# Altium PCB PCB1.PcbDoc
Units mm, origin at the board's own origin, x right, y up, seen from the top; angles counter-clockwise.
Board outline 104 x 72 mm, 4 copper layers (Highspeed layer, GND, VDD, Signal), stack 1.466 mm thick; 91 components, 74 nets, 419 pads, 576 vias.
Unrouted connection lines stored in the file: 77.
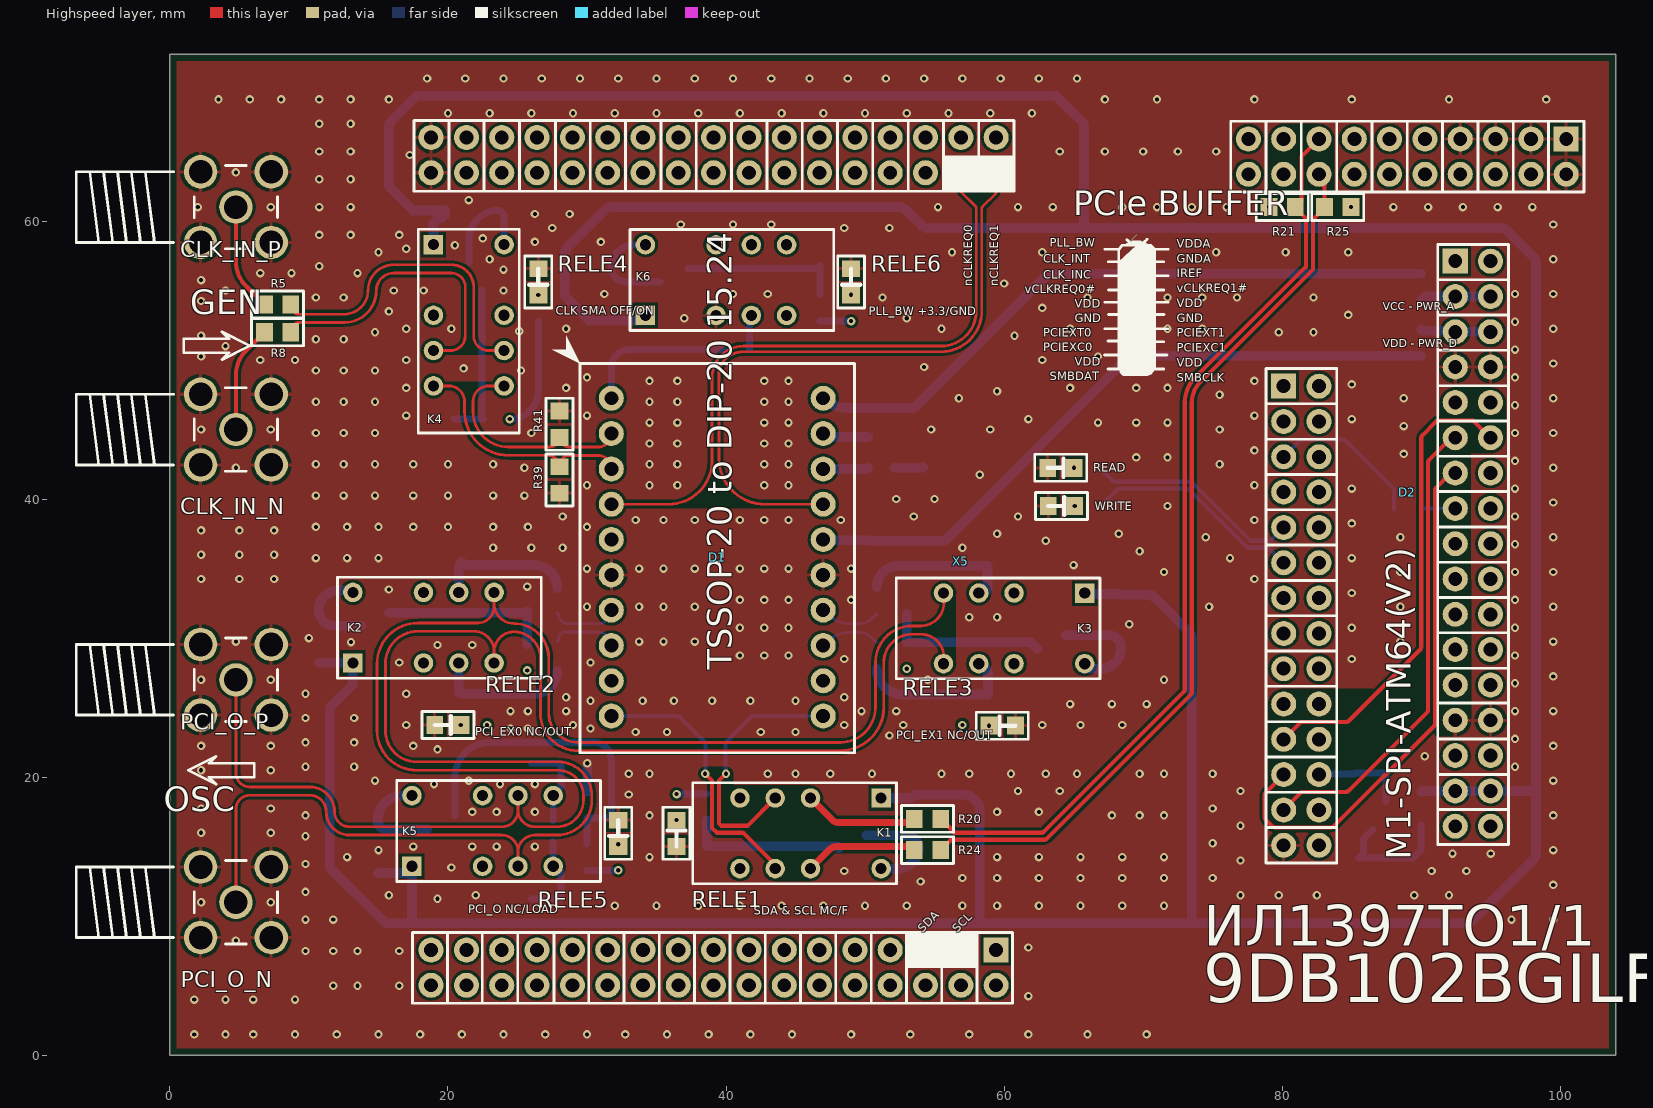
[diagram p0: Highspeed layer view]
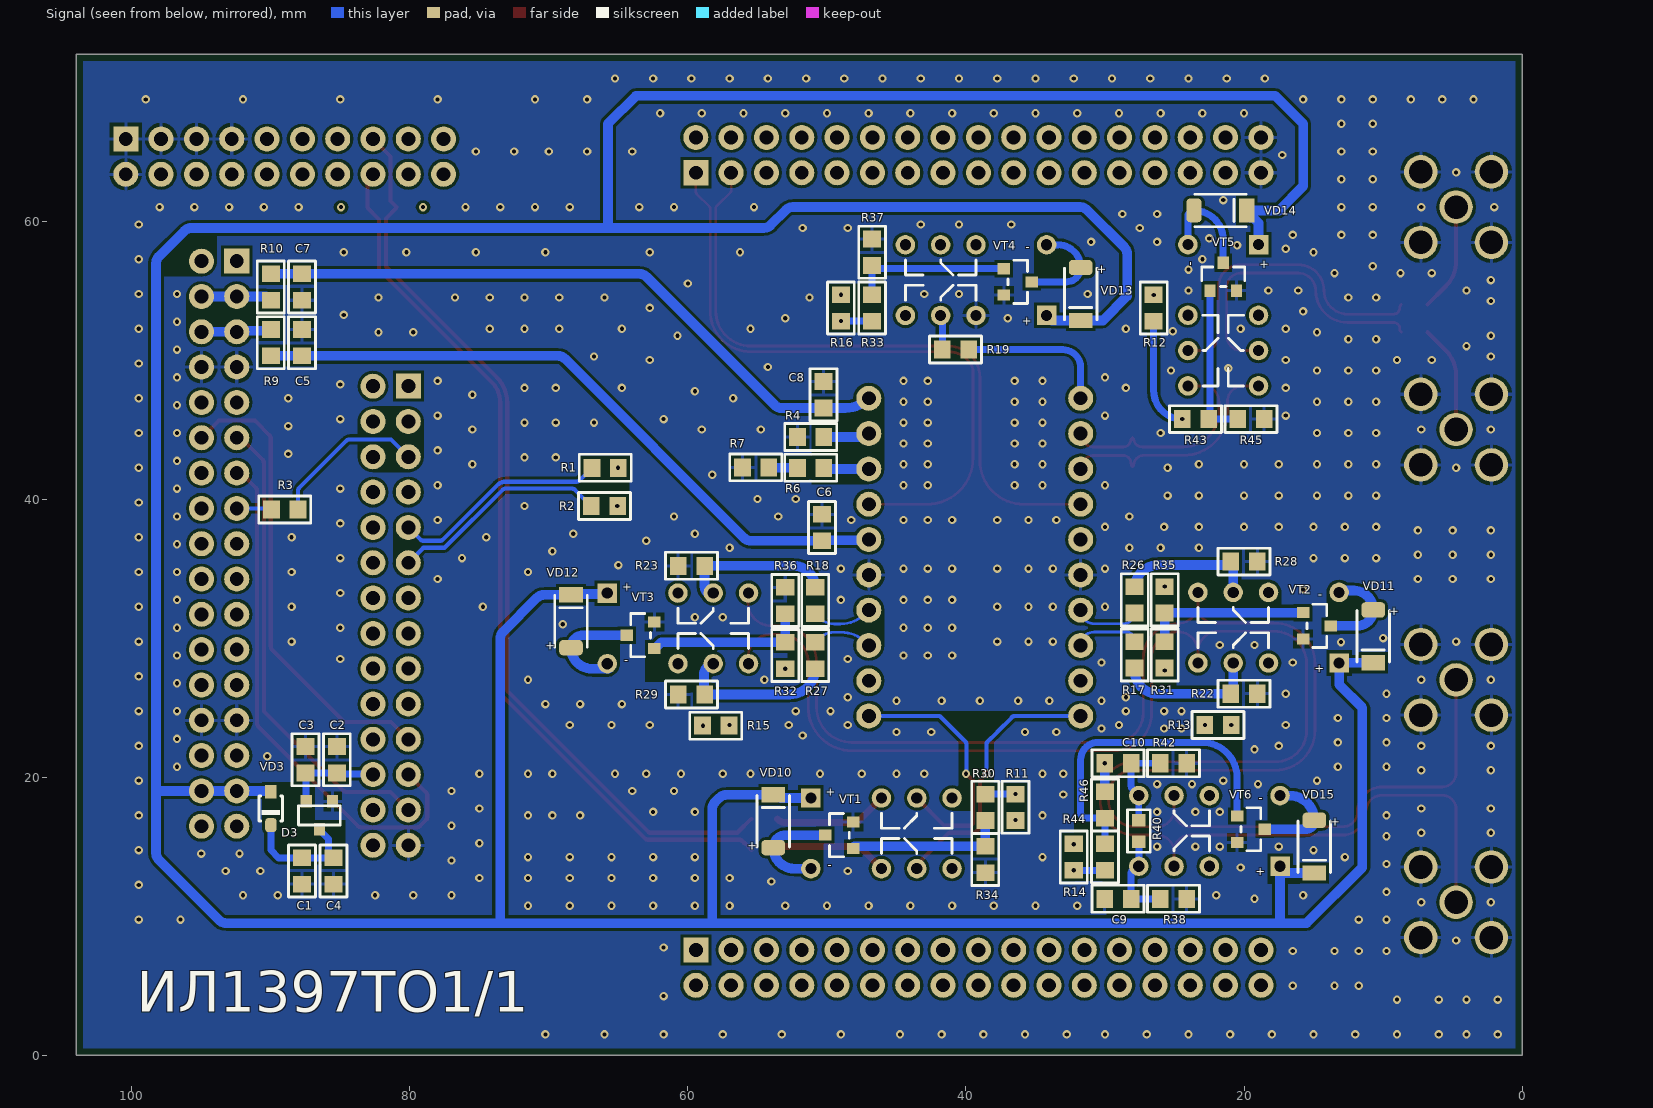
[diagram p1: Signal view, seen from below]
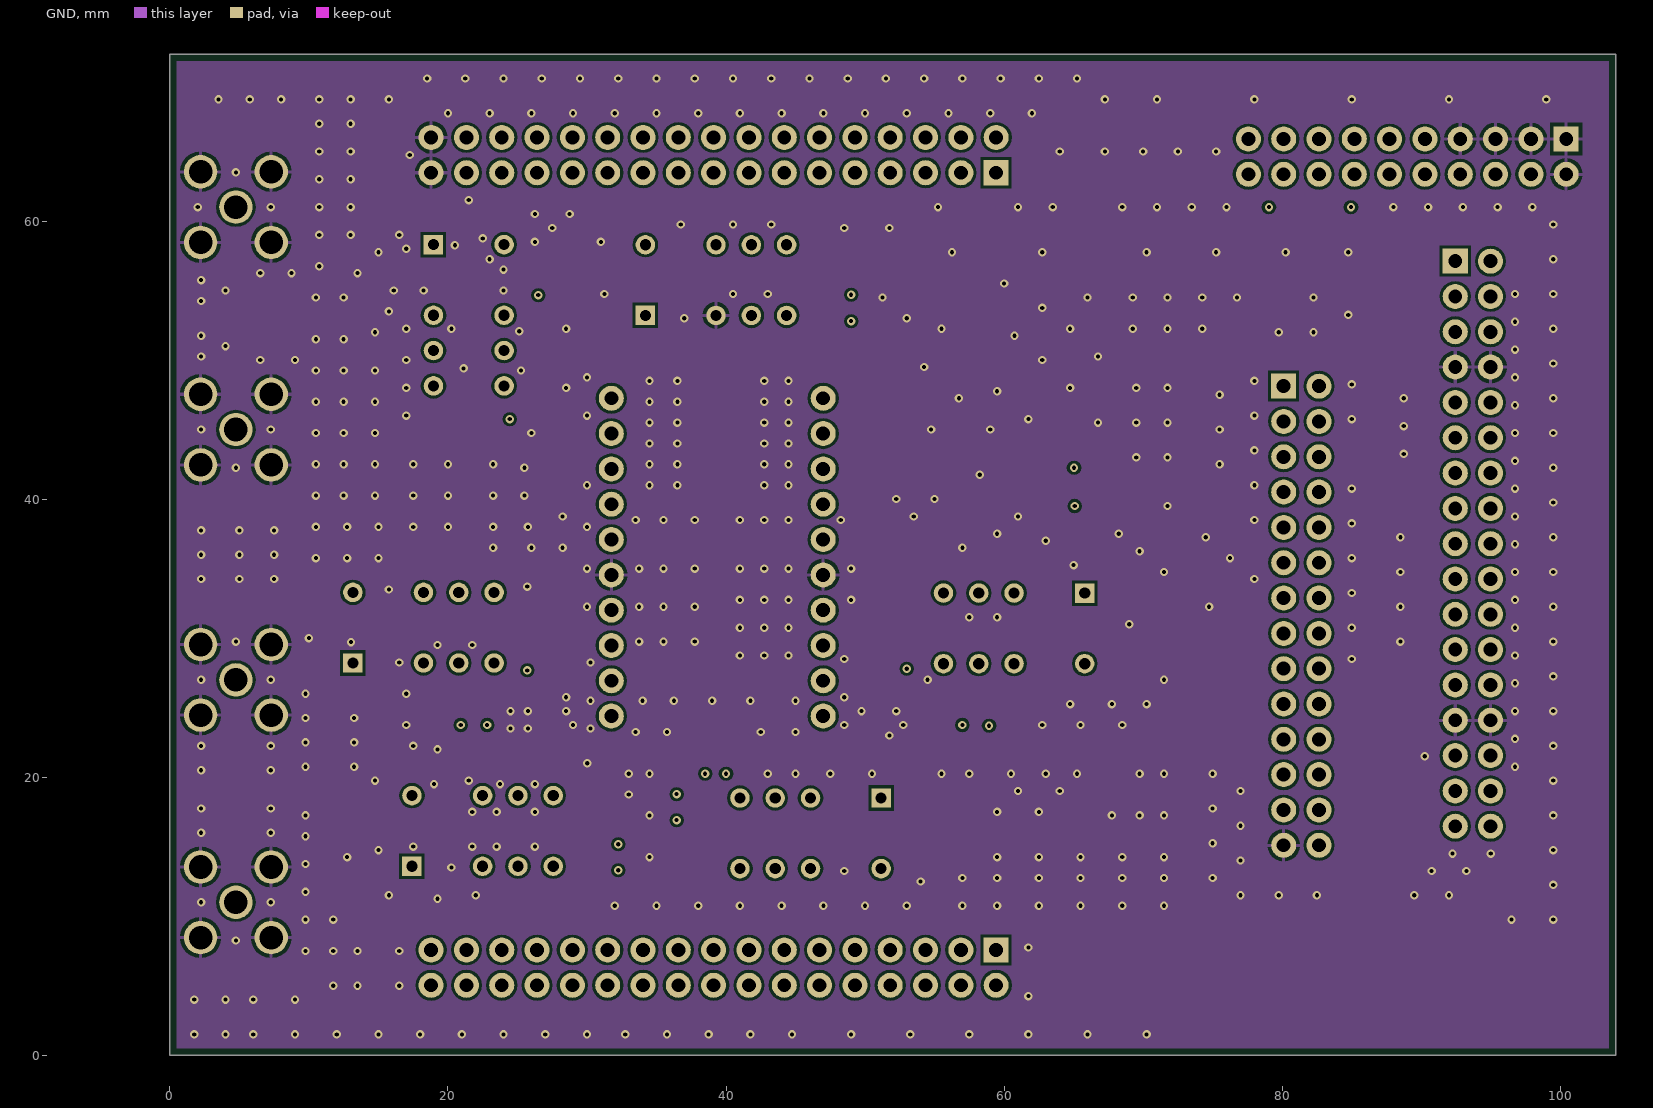
[diagram p2: GND]
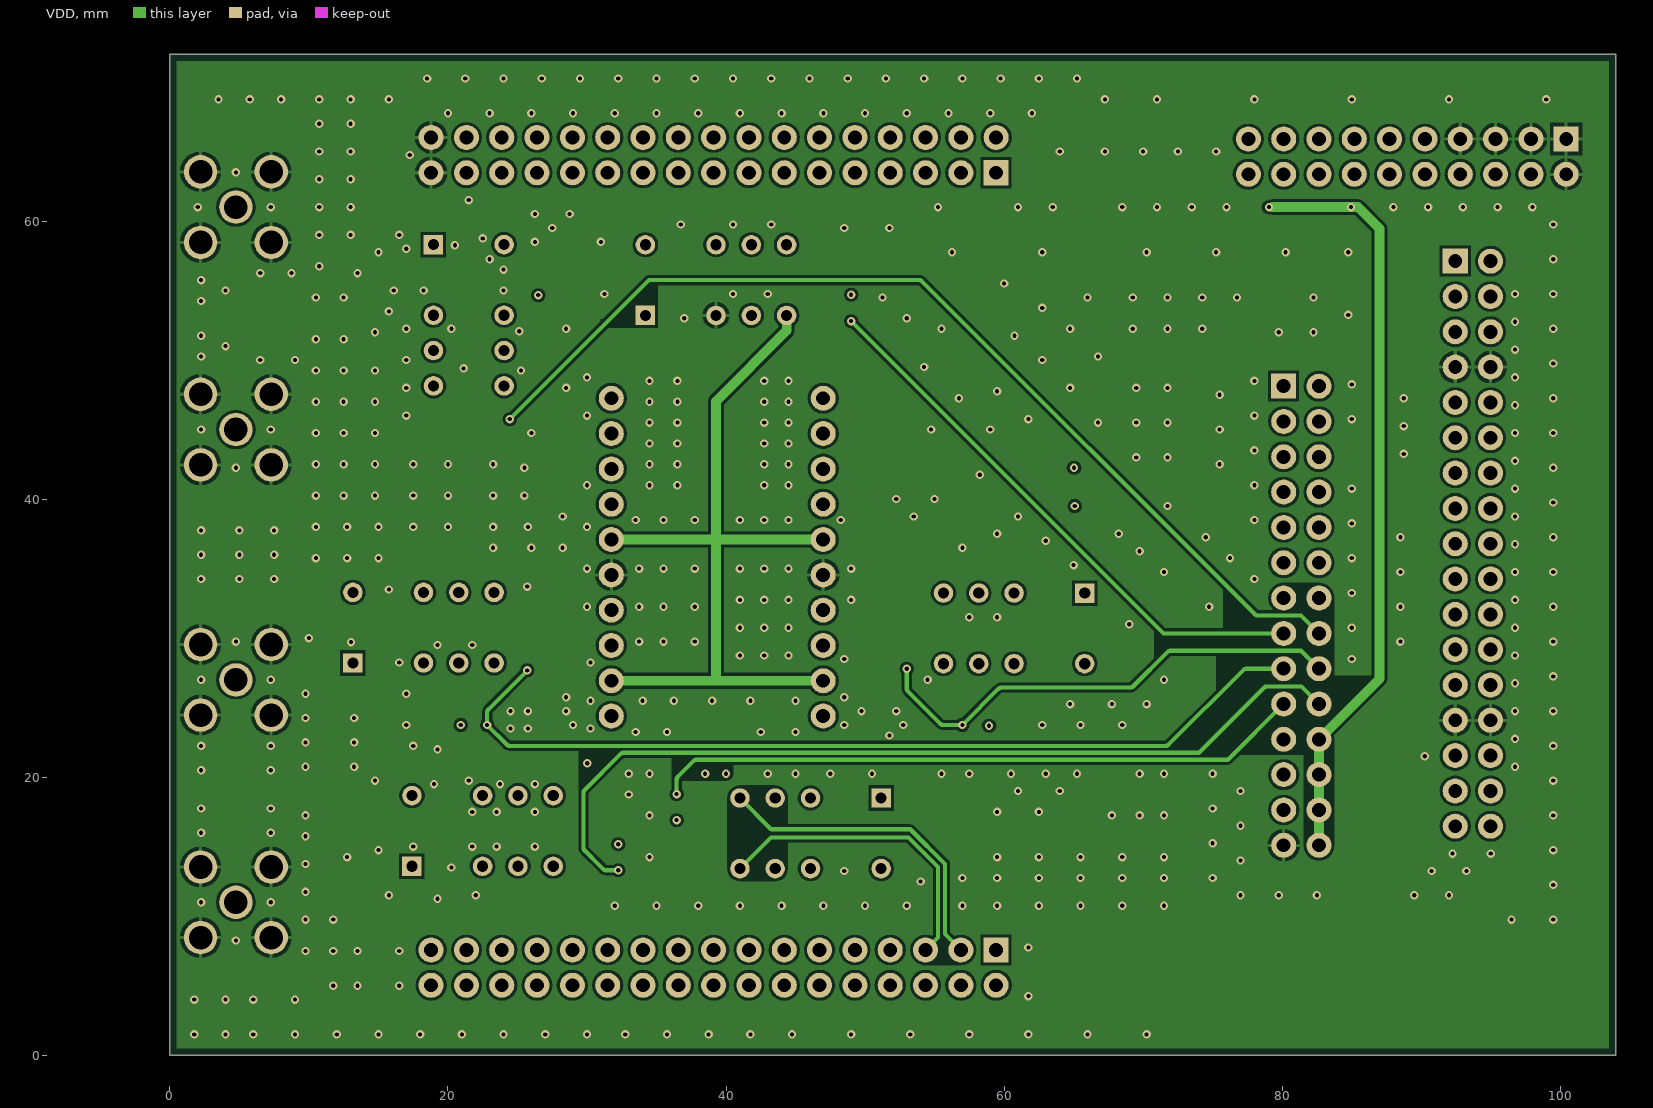
[diagram p3: VDD]

## Layer stack, top to bottom
Top Solder: solder mask 0.025, Solder Resist, Dk 4
Highspeed layer: signal copper 0.018
Dielectric 2: prepreg 0.115, FR4 PR, Dk 4.2
GND: signal copper 0.018
Dielectric 1: core 1.164, FR4 Tg150, Dk 4.6
VDD: signal copper 0.018
Dielectric 3: prepreg 0.115, FR4 PR, Dk 4.2
Signal: signal copper 0.018
Bottom Solder: solder mask 0.025, Solder Resist, Dk 4

## Board outline
0,0 104,0 104,72 0,72

## Design rules (kind name [scope] priority, off if disabled: settings)
Clearance [All] p1: gap=0.2 ignorepadtopadclearanceinfootprint=FALSE except(0: Arc-Hole Track-Hole SMDPad-Hole THPad-Hole Via-Hole Fill-Hole Poly-Hole Region-Hole Text-Hole)
ComponentClearance [All] p1: gap=0 collisioncheckmode=3 verticalgap=0 showdistances=FALSE
DiffPairsRouting [All] p1: maxlimit=0.4 minlimit=0.4 mostfreqgap=0.4 toplayer_minwidth=0.2 toplayer_maxwidth=0.2 toplayer_prefwidth=0.2 midlayer1_minwidth=0.2 midlayer1_maxwidth=0.2 midlayer1_prefwidth=0.2 midlayer2_minwidth=0.2 midlayer2_maxwidth=0.2 midlayer2_prefwidth=0.2 bottomlayer_minwidth=0.2 bottomlayer_maxwidth=0.2 bottomlayer_prefwidth=0.2 maxuncoupledlength=12.7
PolygonConnect [InNet('GND')] p1: thpad.connectstyle=Relief thpad.reliefconductorwidth=0.254 thpad.reliefentries=4 thpad.polygonreliefangle="90 Angle" thpad.airgapwidth=0.254 smdpad.connectstyle=Relief smdpad.reliefconductorwidth=0.254 smdpad.reliefentries=4 smdpad.polygonreliefangle="90 Angle" smdpad.airgapwidth=0.254 via.connectstyle=Direct via.reliefconductorwidth=0.254 via.reliefentries=4 via.polygonreliefangle="90 Angle" via.airgapwidth=0.254
RoutingVias [All] p1: holewidth=0.3 width=0.6 viastyle="Through Hole" minholewidth=0.3 minwidth=0.6 maxholewidth=0.6 maxwidth=1.2
SilkToSilkClearance [All] p1: silktosilkclearance=0
SilkToSolderMaskClearance [IsPad] p1: minsilkscreentomaskgap=0 clearancetoexposedcopper=TRUE
SolderMaskExpansion [All] p1: expansion=0.102 istentingtop=FALSE
Width [All] p1: maxlimit=0.7 minlimit=0.2 preferedwidth=0.3
26 further rules are at their usual default settings.

## Classes and differential pairs
differential pair PCI_O: +PCI_O_P -PCI_O_N
differential pair PCI_EX1: +PCI_EX1_P -PCI_EX1_N
differential pair PCI_EX0: +PCI_EX0_P -PCI_EX0_N
differential pair CLK_IN: +CLK_IN_P -CLK_IN_N
differential pair CLK_IN1: +CLK_IN1_P -CLK_IN1_N

## Components (designator, comment, footprint, x,y, rotation, side; value= is the part's Value field where it differs from the comment)
C1 "10uF" 0805 87.75,13.25 r270 bottom
C2 "0.1uF" 0805 85.25,21.25 r90 bottom
C3 "10uF" 0805 87.5,21.25 r90 bottom
C4 "0.1uF" 0805 85.5,13.25 r270 bottom
C5 "10uF" 0805 87.75,51.25 r90 bottom
C6 "0.1uF" 0805 50.35,37.948 r90 bottom
C7 "10uF" 0805 87.75,55.25 r270 bottom
C8 "0.1uF" 0805 50.25,47.5 r90 bottom
C9 "2pF" 0805 29.074,11.25 r0 bottom
C10 "2pF" 0805 29.074,21 r0 bottom
CLK_IN_N "KLS1-SMA002-B" KLS1-SMA002-B 4.75,45 r90 top (schematic designator X2)
CLK_IN_P "KLS1-SMA002-B" KLS1-SMA002-B 4.75,61 r90 top (schematic designator X1)
D1 "9DB102BGILF" "TSSOP-20 to DIP-20" 31.75,47.25 r0 top
D2 "M1-SPI-ATM64(V2)" M1-SPI-ATM64(V2) 89,40.5 r270 top
D3 "MCP1700T-3302E/TT" SOT-23#1 86.5,17.25 r0 bottom
K1 "V23079A1001B301 TE" V23079A1001B301 44.86,15.96 r180 top
K2 "V23079A1001B301 TE" V23079A1001B301 19.46,30.75 r0 top
K3 "V23079A1001B301 TE" V23079A1001B301 59.5,30.7 r180 top
K4 "V23079A1001B301 TE" V23079A1001B301 21.5,52 r270 top locked
K5 "V23079A1001B301 TE" V23079A1001B301 23.714,16.13 r0 top
K6 "V23079A1001B301 TE" V23079A1001B301 40.5,55.75 r0 top
PCI_O_N "KLS1-SMA002-B" KLS1-SMA002-B 4.75,11 r90 top (schematic designator X4)
PCI_O_P "KLS1-SMA002-B" KLS1-SMA002-B 4.75,27 r90 top (schematic designator X3)
R1 "1k" 0805 65.95,42.25 r180 bottom
R2 "1k" 0805 66,39.5 r180 bottom
R3 "100" 0805 89,39.25 r0 bottom
R4 "0" 0805 51.172,44.464 r180 bottom
R5 "33" 0805 7.75,54 r180 top
R6 "470" 0805 51.172,42.25 r0 bottom
R7 "5" 0805 55.128,42.28 r0 bottom
R8 "33" 0805 7.75,52 r180 top
R9 "0" 0805 90,51.25 r270 bottom
R10 "0" 0805 90,55.25 r90 bottom
R11 "1k" 0805 36.447,17.83 r270 bottom
R12 "1k" 0805 26.5,53.75 r90 bottom
R13 "1k" 0805 21.87,23.75 r180 bottom
R14 "1k" 0805 32.25,14.25 r90 bottom
R15 "1k" 0805 58,23.7 r0 bottom
R16 "1k" 0805 49,53.75 r90 bottom
R17 "33" 0805 27.866,28.795 r270 bottom
R18 "33" 0805 50.843,32.701 r90 bottom
R19 "100" 0805 40.75,50.75 r0 bottom
R20 "100" 0805 54.5,17 r0 top
R21 "10k" 0805 80,61 r180 top
R22 "49.9" 0805 20,26 r0 bottom
R23 "49.9" 0805 59.75,35.2 r180 bottom
R24 "100" 0805 54.5,14.75 r0 top
R25 "10k" 0805 84,61 r0 top
R26 "33" 0805 27.866,32.751 r90 bottom
R27 "33" 0805 50.843,28.745 r270 bottom
R28 "49.9" 0805 20,35.5 r0 bottom
R29 "49.9" 0805 59.75,25.95 r180 bottom
R30 "1k" 0805 38.61,17.83 r270 bottom
R31 "1k" 0805 25.71,28.795 r90 bottom
R32 "1k" 0805 53,28.745 r90 bottom
R33 "1k" 0805 46.75,53.75 r90 bottom
R34 "20k" 0805 38.61,14.08 r270 bottom
R35 "20k" 0805 25.71,32.751 r90 bottom
R36 "20k" 0805 53,32.7 r90 bottom
R37 "20k" 0805 46.75,57.75 r90 bottom
R38 "150" 0805 25.074,11.25 r180 bottom
R39 "10k" 0805 28.03,41.38 r270 top
R40 "100" 0603 27.571,16.13 r270 bottom
R41 "10k" 0805 28.03,45.38 r90 top
R42 "150" 0805 25.074,21 r0 bottom
R43 "1k" 0805 23.5,45.75 r180 bottom
R44 "1k" 0805 30.009,14.25 r90 bottom
R45 "20k" 0805 19.5,45.75 r180 bottom
R46 "20k" 0805 30,18 r90 bottom
READ "LED(0805)" 0805(LED) 64.08,42.25 r180 top (schematic designator VD1)
RELE1 "LED(0805)" 0805(LED) 36.447,15.96 r270 top (schematic designator VD4)
RELE2 "LED(0805)" 0805(LED) 20,23.75 r180 top (schematic designator VD6)
RELE3 "LED(0805)" 0805(LED) 59.87,23.7 r0 top (schematic designator VD8)
RELE4 "LED(0805)" 0805(LED) 26.5,55.62 r90 top (schematic designator VD5)
RELE5 "LED(0805)" 0805(LED) 32.25,15.96 r90 top (schematic designator VD7)
RELE6 "LED(0805)" 0805(LED) 49,55.62 r90 top (schematic designator VD9)
VD3 "BAT20JFILM (SOD323)" SOD323 90,17.75 r90 bottom
VD10 "LL4148 NXP" SOD80C 53.86,16.83 r90 bottom
VD11 "LL4148 NXP" SOD80C 10.71,30.13 r270 bottom
VD12 "LL4148 NXP" SOD80C 68.41,31.21 r90 bottom
VD13 "LL4148 NXP" SOD80C 31.75,54.75 r270 bottom
VD14 "LL4148 NXP" SOD80C 21.7,60.76 r180 bottom
VD15 "LL4148 NXP" SOD80C 14.944,15 r270 bottom
VT1 "MMBT5551L" SOT-23#2 49.11,15.83 r90 bottom
VT2 "MMBT5551L" SOT-23#2 14.76,30.88 r270 bottom
VT3 "MMBT5551L" SOT-23#2 63.41,30.21 r90 bottom
VT4 "MMBT5551L" SOT-23#2 36.27,55.62 r270 bottom
VT5 "MMBT5551L" SOT-23#2 21.5,56 r180 bottom
VT6 "MMBT5551L" SOT-23#2 19.5,16.25 r270 bottom
WRITE "LED(0805)" 0805(LED) 64.13,39.5 r180 top (schematic designator VD2)
X5 "FORMULA" FORMULA 47.25,34.25 r0 top locked

## Footprints (in the part's own frame and the unit in brackets; to place one, negate y for a bottom-side part, rotate by r counter-clockwise, add the part's x,y. Pads: shape width x height; smd on the part's side, far side on the other; paste and mask are expansions set on the pad)
0603 [mm]
  rect 0.9x1 smd: 1(-0.76,0) 2(0.76,0)
  silkscreen extent -1.53,-0.82 1.53,0.82, body extent -0.8,-0.4 0.8,0.4, height 0.45
0805 [mm]
  rect 1.2x1.3 smd: 1(-0.95,0) 2(0.95,0)
  silkscreen extent -1.87,-0.97 1.87,0.97, body extent -1.05,-0.63 0.95,0.63, height 0.55
0805(LED) [mm]
  rect 1.2x1.3 smd: 1(-0.95,0) 2(0.95,0)
  silkscreen extent -1.87,-0.97 1.87,0.97, body extent -1.03,-0.41 1.03,0.5, height 0.85
FORMULA [mm]
  rect 1.8x1.8 hole 1: 1(12.18,29.22) VDDF(12.18,-26.68) VEEF(45.2,22.86)
  round 1.8 hole 1: 2(9.64,29.22) 3(7.1,29.22) 4(4.56,29.22) 5(2.02,29.22) 6(-0.52,29.22) 7(-3.06,29.22) 8(-5.6,29.22) 9(-8.14,29.22) 10(-10.68,29.22) 11(-13.22,29.22) 12(-15.76,29.22) 13(-18.3,29.22) 14(-20.84,29.22) 15(-23.38,29.22) 16(-25.92,29.22) 17(12.18,31.76) 18(9.64,31.76) 19(7.1,31.76) 20(4.56,31.76) 21(2.02,31.76) 22(-0.52,31.76) 23(-3.06,31.76) 24(-5.6,31.76) 25(-8.14,31.76) 26(-10.68,31.76) 27(-13.22,31.76) 28(-15.76,31.76) 29(-18.3,31.76) 30(-20.84,31.76) 31(-23.38,31.76) 32(-25.92,31.76) 33(-28.46,-29.22) 34(-25.92,-29.22) 35(-23.38,-29.22) 36(-20.84,-29.22) 37(-18.3,-29.22) 38(-15.76,-29.22) 39(-13.22,-29.22) 40(-10.68,-29.22) 41(-8.14,-29.22) 42(-5.6,-29.22) 43(-3.06,-29.22) 44(-0.52,-29.22) 45(2.02,-29.22) 46(4.56,-29.22) 47(7.1,-29.22) 48(9.64,-29.22) 49(-28.46,-26.68) 50(-25.92,-26.68) 51(-23.38,-26.68) 52(-20.84,-26.68) 53(-18.3,-26.68) 54(-15.76,-26.68) 55(-13.22,-26.68) 56(-10.68,-26.68) 57(-8.14,-26.68) 58(-5.6,-26.68) 59(-3.06,-26.68) 60(-0.52,-26.68) 61(2.02,-26.68) 62(4.56,-26.68) 63(7.1,-26.68) 64(9.64,-26.68) +5V(45.2,-15.24) +5V(47.74,-15.24) +5V_VCCF(45.2,20.32) +5V_VCCS(47.74,20.32) +5V_VDDF(45.2,17.78) +5V_VDDS(47.74,17.78) +12V(45.2,-12.7) +12V(47.74,-12.7) -12V(45.2,-17.78) -12V(47.74,-17.78) GND(-28.46,29.22) GND(-28.46,31.76) GND(45.2,-10.16) GND(45.2,15.24) GND(47.74,-10.16) GND(47.74,15.24) IN-OUT1(47.74,10.16) IN-OUT2(47.74,7.62) IN-OUT3(47.74,5.08) IN-OUT4(47.74,2.54) IN-OUT5(47.74,0) IN-OUT6(47.74,-2.54) IN-OUT7(47.74,-5.08) IN-OUT8(47.74,-7.62) NC(45.2,12.7) NC(47.74,12.7) OUT1(45.2,10.16) OUT2(45.2,7.62) OUT3(45.2,5.08) OUT4(45.2,2.54) OUT5(45.2,0) OUT6(45.2,-2.54) OUT7(45.2,-5.08) OUT8(45.2,-7.62) VDDS(12.18,-29.22) VEES(47.74,22.86)
  silkscreen extent -29.8,-30.51 49.02,32.97, body extent -29.79,-30.4 48.98,32.92, height 3
KLS1-SMA002-B [mm]
  round 2.4 hole 1.7: 1(0,0) 2(-2.54,-2.54) 2(-2.54,2.54) 2(2.54,-2.54) 2(2.54,2.54)
  silkscreen extent -3,-3 3,11.49, body extent -3.5,-3.5 3.5,11.65, height 10
M1-SPI-ATM64(V2) [mm]
  rect 1.8x1.8 hole 1: 1X2(-25.4,11.43) 1X3(-7.62,-8.89)
  round 1.8 hole 1: 2X2(-22.86,11.43) 2X3(-7.62,-6.35) 3X2(-25.4,8.89) 3X3(-5.08,-8.89) 4X2(-22.86,8.89) 4X3(-5.08,-6.35) 5X2(-25.4,6.35) 5X3(-2.54,-8.89) 6X2(-22.86,6.35) 6X3(-2.54,-6.35) 7X2(-25.4,3.81) 7X3(0,-8.89) 8X2(-22.86,3.81) 8X3(0,-6.35) 9X2(-25.4,1.27) 9X3(2.54,-8.89) 10X2(-22.86,1.27) 10X3(2.54,-6.35) 11X2(-25.4,-1.27) 11X3(5.08,-8.89) 12X2(-22.86,-1.27) 12X3(5.08,-6.35) 13X2(-25.4,-3.81) 13X3(7.62,-8.89) 14X2(-22.86,-3.81) 14X3(7.62,-6.35) 15X2(-25.4,-6.35) 15X3(10.16,-8.89) 16X2(-22.86,-6.35) 16X3(10.16,-6.35) 17X2(-25.4,-8.89) 17X3(12.7,-8.89) 18X2(-22.86,-8.89) 18X3(12.7,-6.35) 19X2(-25.4,-11.43) 19X3(15.24,-8.89) 20X2(-22.86,-11.43) 20X3(15.24,-6.35) 21X3(17.78,-8.89) 22X3(17.78,-6.35) 23X3(20.32,-8.89) 24X3(20.32,-6.35) 25X3(22.86,-8.89) 26X3(22.86,-6.35) 27X3(25.4,-8.89) 28X3(25.4,-6.35)
  silkscreen extent -26.67,-12.7 26.67,12.7
SOD80C [mm]
  rrect50% 1.1x1.7 smd: 1(-1.9,0)
  rect 1.1x1.7 smd: 2(1.9,0)
  silkscreen extent -1.85,-1.17 1.85,1.17, body extent -1.9,-0.8 1.8,0.8, height 1.55
SOD323 [mm]
  rect 1x0.8 smd: 1(1.2,0)
  rrect50% 1x0.8 smd: 2(-1.2,0)
  silkscreen extent -0.9,-0.84 0.9,0.84, body extent -1.41,-0.67 1.19,0.67, height 1.1
SOT-23#1 [mm]
  rect 0.8x0.9 smd: 1(-0.95,-1) 2(0.95,-1) 3(0,1)
  silkscreen extent -1.5,-0.7 1.5,0.7, body extent -1.5,-1.15 1.5,1.15, height 1.09
SOT-23#2 [mm]
  rect 0.8x0.9 smd: 1(-0.95,-1) 1(-0.95,-1) 2(0.95,-1) 2(0.95,-1) 3(0,1) 3(0,1)
  silkscreen extent -1.55,-0.72 1.55,0.7, body extent -1.5,-1.25 1.5,1.25, height 1.05
"TSSOP-20 to DIP-20" [mm]
  round 1.8 hole 1: 1(0,0) 2(0,-2.54) 3(0,-5.08) 4(0,-7.62) 5(0,-10.16) 6(0,-12.7) 7(0,-15.24) 8(0,-17.78) 9(0,-20.32) 10(0,-22.86) 11(15.24,-22.86) 12(15.24,-20.32) 13(15.24,-17.78) 14(15.24,-15.24) 15(15.24,-12.7) 16(15.24,-10.16) 17(15.24,-7.62) 18(15.24,-5.08) 19(15.24,-2.54) 20(15.24,0)
  silkscreen extent -2.25,-25.5 17.5,2.5, body extent -1,-24.45 16.5,1.5, height 8.5
V23079A1001B301 [mm]
  rect 1.4x1.4 hole 0.8: 1(-6.3,-2.54)
  round 1.4 hole 0.8: 3(-1.22,-2.54) 4(1.32,-2.54) 5(3.86,-2.54) 8(3.86,2.54) 9(1.32,2.54) 10(-1.22,2.54) 12(-6.3,2.54)
  silkscreen extent -7.4,-3.63 7.25,3.63, body extent -7.25,-3.6 7.25,3.6, height 9.4

## Part data
C1 C2 C3 C4 C5 C6 C7 C8 C9 C10: library part C0805, ComponentHeigt=1.3, Firme=AVX, KIND=Конденсатор, Leadform=SMD, Packaging=0805
R1 R2 R3 R4 R5 R8 R9 R10 R11 R12 R13 R14 R15 R16 R17 R18 R19 R20 R21 R22 R23 R24 R25 R26 R27 R28 R29 R30 R31 R32 R33 R34 R35 R36 R37 R38 R39 R41 R42 R43 R44 R45 R46: library part "R0805 Yageo", ComponentHeigt=0.6, Firme=Yageo, KIND=Резистор, Leadform=SMD, Packaging=0805
R6 R7: library part "R0805 Yageo", "1%", ComponentHeigt=0.6, Firme=Yageo, KIND=Резистор, Leadform=SMD, Packaging=0805
R40: library part "R0603 Yageo", ComponentHeigt=0.5, Firme=Yageo, KIND=Резистор, Leadform=SMD, Packaging=0402
CLK_IN_N CLK_IN_P D2 PCI_O_N PCI_O_P: ComponentHeigt=5.5, Name=Вилка, Specification="Вилка PLD2-2 *", Typ=PLD2-2
D3: ComponentHeigt=1.8, Firme=Linear, KIND=Микросхема, Leadform=формована, Packaging=SOT-223
READ RELE1 RELE2 RELE3 RELE4 RELE5 RELE6 VD3 WRITE: ComponentHeigt=0.75, Firme=Kingbright, KIND="Светодиод L-1154GD Kingbright", Leadform="в отверстия", NN=24003000
VD10 VD11 VD12 VD13 VD14 VD15: Component Link=http://www.nxp.com, ComponentHeigt=1.6, Firme=NXP, KIND="Диод LL4148 NXP", Leadform=SMD, NN=24009301, Packaging=SOD-80C
VT1 VT2 VT3 VT4 VT5 VT6: ComponentHeigt=1.1, Firme=ONS, KIND="Транзистор MMBT5551L*G ONS", Leadform=SMD, NN=24007468, Packaging=SOT-23

## Via types
v1: diameter 0.6, hole 0.3, Highspeed layer to Signal, tented both sides, 576 vias

## Nets (pads, with @x,y where several pads share a name; then routed paths per layer and width w, separated by ;. In a path a pad name is that pad's centre, name@x,y a point inside that pad or via, vN(x,y) a via of type N, cw(c..) or ccw(c..) an arc to the next point about the centre after c; other vN are vias at no path point)
+3.3_PWR_A: C7.1 C8.1 D1.20 R10.2 | length 47.1
  Signal w0.7: D1.20 ccw(c48.68,48.94) 48.68,46.55 C8.1 53.26,46.55 ccw(c53.26,47.25) 53.754,46.754 62.996,55.996 cw(c63.49,55.5) 63.488,56.2 63.49,56.2 C7.1 R10.2
+3.3_PWR_D: C5.1 C6.1 D1.5 D1.9 D1.12 D1.16 K6.5 R9.2 | length 107.8
  VDD w0.7: D1.9@31.385,26.997 31.452,26.93 D1.9 39.37,26.93 ; D1.5 39.28,37.09 ; K6.5 44.36,52.11 39.28,47.03 39.28,37.09 ; D1.12 39.37,26.93 ; D1.16 39.28,37.09 ; 39.28,37.09 39.28,27.02 39.37,26.93
  Signal w0.7: D1.16 47.036,37.044 50.304,37.044 C6.1 55.458,36.998 ccw(c55.458,37.698) 55.952,37.202 68.846,50.096 cw(c69.34,49.6) 69.338,50.3 69.34,50.3 C5.1 R9.2
+3.3V_MC: C2.1 C3.1 D2.22X3 D2.24X3 D2.26X3 D2.28X3 D3.2 R21.2 R25.2 | length 61.5
  VDD w0.7: v1@79.3,61 85.2,61 85.455,61 87,59.455 87,27.07 D2.22X3 D2.24X3 D2.26X3 D2.28X3
  Signal w0.5: D2.24X3 82.71,20.24 85.19,20.24 C2.1 C3.1 87.475,20.275 87.475,18.275 D3.2
  other v1: 79.05,61 84.95,61
+3.3V_VCC: R10.1 X5.+5V_VCCF X5.+5V_VCCS | length 5.1
  Signal w0.7: R10.1 90.05,54.3 90.32,54.57 X5.+5V_VCCF X5.+5V_VCCS
+3.3V_VDD: R9.1 X5.+5V_VDDF X5.+5V_VDDS | length 5.1
  Signal w0.7: R9.1 90.085,52.115 92.365,52.115 X5.+5V_VDDF X5.+5V_VDDS
+5V_CONST: K1.1 K2.1 K3.1 K4.1 K5.1 K6.1 VD3.1 VD10.2 VD11.2 VD12.2 VD13.2 VD14.2 VD15.2 X5.+5V | length 365.9
  Signal w0.7: VD11.2 10.72,28.22 13.15,28.22 K2.1 13.16,26.66 11.5,25 11.5,13.5 15.5,9.5 17.414,9.5 ; VD15.2 16.924,13.1 ccw(c16.924,13.59) K5.1 17.414,9.5 ; K4.1 18.96,59.85 19.37,60.26 19.6,60.26 19.8,60.46 VD14.2 17.49,60.76 15.75,62.5 15.75,67 17.75,69 63.75,69 65.75,67 65.75,59.5 ; K6.1 cw(c33.84,53.21) 33.84,52.85 30.15,52.85 28.408,54.592 28.408,57.62 cw(c29.108,57.618) 28.612,58.112 31.296,60.796 cw(c31.79,60.3) 31.788,61 31.79,61 52.46,61 cw(c52.46,60.3) 52.953,60.797 54.046,59.704 ccw(c54.54,60.2) 54.538,59.5 65.75,59.5 ; K1.1 53.33,18.5 53.56,18.73 57.23,18.73 cw(c57.23,18.03) 57.724,18.526 58.046,18.204 cw(c57.55,17.71) 58.25,17.71 58.25,9.5 ; K3.1 65.865,33.175 68.345,33.175 VD12.2 70.35,33.11 cw(c70.35,32.41) 70.843,32.907 73.296,30.454 cw(c72.8,29.96) 73.5,29.962 73.5,29.96 73.5,9.5 ; VD3.1 90,18.96 90.05,19.01 92.45,19.01 94.99,19.01 97.99,19.01 98.25,18.75 ; 17.414,9.5 58.25,9.5 ; 58.25,9.5 73.5,9.5 ; 65.75,59.5 95.71,59.5 cw(c95.71,58.8) 96.206,59.294 98.045,57.455 cw(c97.55,56.96) 98.25,56.962 98.25,56.96 98.25,18.75 ; 73.5,9.5 93.21,9.5 ccw(c93.21,10.2) 93.704,9.704 98.047,14.047 ccw(c97.55,14.54) 98.25,14.54 98.25,18.75
CLK_IN1_N: K4.4 R8.1 | length 22
  Highspeed layer w0.2: R8.1 ccw(c8.459,52.241) 8.8,52.241 cw(c9.259,52.241) 9.259,52.7 12.55,52.7 ccw(c12.55,55) 14.85,55 cw(c16.1,55) 16.1,56.25 20.25,56.25 cw(c20.25,55.25) 21.25,55.25 21.25,51.75 cw(c20.18,51.75) 20.18,50.68 K4.4
CLK_IN1_P: K4.9 R5.1 | length 22.8
  Highspeed layer w0.2: R5.1 cw(c8.459,53.759) 8.8,53.759 ccw(c9.259,53.759) 9.259,53.3 12.55,53.3 ccw(c12.55,55) 14.25,55 cw(c16.1,55) 16.1,56.85 20.25,56.85 cw(c20.25,55.25) 21.85,55.25 21.85,51.75 ccw(c22.92,51.75) 22.92,50.68 K4.9
CLK_IN_N: D1.3 K4.5 R39.1 | length 17.4
  Highspeed layer w0.2: K4.5 20.06,48.14 cw(c20.06,47) 21.2,47 21.2,46.29 ccw(c24.34,46.29) 24.34,43.15 27.21,43.15 cw(c27.21,42.43) 27.93,42.43 R39.1 ccw(c27.789,42.571) 28.13,42.571 cw(c28.699,42.571) 28.699,43.14 30.78,43.14 cw(c30.78,42.17) D1.3
CLK_IN_P: D1.2 K4.8 R41.1 | length 16.3
  Highspeed layer w0.2: K4.8 22.94,48.14 ccw(c22.94,47) 21.8,47 21.8,46.29 ccw(c24.34,46.29) 24.34,43.75 27.35,43.75 ccw(c27.35,44.33) 27.93,44.33 R41.1 28.13,44.33 ccw(c28.72,44.33) 28.72,43.74 30.78,43.74 ccw(c30.78,44.71) D1.2
DI1_MC: D2.21X3 X5.IN-OUT1 | length 33.8
  Highspeed layer w0.3: D2.21X3 81.36,23.97 84.596,23.97 ccw(c84.596,24.27) 84.807,24.057 89.913,29.163 ccw(c89.7,29.374) 90,29.374 90,44.377 cw(c90.3,44.376) 90.087,44.587 91.073,45.573 cw(c91.284,45.36) 91.284,45.66 93.74,45.66 X5.IN-OUT1
DO1_MC: D2.25X3 X5.OUT1 | length 33.9
  Highspeed layer w0.3: D2.25X3 81.4,18.93 84.556,18.93 ccw(c84.556,19.23) 84.767,19.017 90.413,24.663 ccw(c90.2,24.874) 90.5,24.874 90.5,42.627 cw(c90.8,42.626) 90.587,42.837 92.073,44.323 cw(c92.284,44.11) 92.284,44.41 X5.OUT1
DO2_MC: D2.23X3 X5.OUT2 | length 38.1
  Highspeed layer w0.3: D2.23X3 78.838,18.908 ccw(c79.05,18.696) 78.75,18.696 78.75,17.124 ccw(c79.05,17.124) 78.837,16.913 79.273,16.477 ccw(c79.484,16.69) 79.483,16.39 83.516,16.39 ccw(c83.516,16.69) 83.727,16.477 90.913,23.663 ccw(c90.7,23.874) 91,23.874 91,40.627 cw(c91.3,40.626) 91.087,40.837 92.033,41.783 cw(c92.244,41.57) 92.244,41.87 X5.OUT2
GND: C1.2 C2.2 C3.2 C4.2 C5.2 C6.2 C7.2 C8.2 C9.2 C10.2 CLK_IN_N.2 CLK_IN_P.2 D1.6 D1.15 D2.1X2 D2.2X2 D2.3X2 D2.5X2 D2.7X2 D2.27X3 D3.1 K6.3 PCI_O_N.2 PCI_O_P.2 R4.1 R7.2 R22.1 R23.1 R28.1 R29.1 R34.2 R35.2 R36.2 R37.2 R38.2 R39.2 R41.2 R42.1 R45.2 R46.2 READ.2 RELE1.2 RELE2.2 RELE3.2 RELE4.2 RELE5.2 RELE6.2 VT1.2 VT2.2 VT3.2 VT4.2 VT5.2 VT6.2 WRITE.2 X5.GND | length 2.1
  Signal w0.7: R46.2 30.024,18.95 v1(30.024,21)
  other v1: 1.75,1.5 4,1.5 6,1.5 9,1.5 12,1.5 15,1.5 18,1.5 21,1.5 24,1.5 27,1.5 30,1.5 32.75,1.5 35.75,1.5 38.75,1.5 41.75,1.5 44.75,1.5 49,1.5 53.25,1.5 57.5,1.5 61.75,1.5 66,1.5 70.25,1.5 1.75,4 4,4 6,4 9,4 61.75,4.25 11.75,5 13.5,5 16.5,5 9.75,7.5 11.75,7.5 13.5,7.5 16.5,7.5 61.75,7.75 4.75,8.25 9.75,9.75 11.75,9.75 96.5,9.75 99.5,9.75 32,10.75 35,10.75 38,10.75 41,10.75 44,10.75 47,10.75 50,10.75 53,10.75 57,10.75 59.5,10.75 62.5,10.75 65.5,10.75 68.5,10.75 71.5,10.75 2.25,11 7.25,11 19.25,11.25 15.75,11.5 22,11.5 77,11.5 79.75,11.5 82.5,11.5 89.5,11.5 92,11.5 9.75,11.75 99.5,12.25 54,12.5 57,12.75 59.5,12.75 62.5,12.75 65.5,12.75 68.5,12.75 71.5,12.75 75,12.75 48.5,13.25 90.75,13.25 93.25,13.25 20.25,13.5 9.75,13.75 77,14 12.75,14.25 34.5,14.25 59.5,14.25 62.5,14.25 65.5,14.25 68.5,14.25 71.5,14.25 92.25,14.5 95,14.5 15,14.75 99.5,14.75 17.5,15 21.75,15 23.5,15 26.25,15 75,15.25 9.75,15.75 2.25,16 7.25,16 77,16.5 9.75,17.25 34.5,17.25 67.75,17.25 69.75,17.25 71.5,17.25 99.5,17.25 21.75,17.5 23.5,17.5 26.25,17.5 59.5,17.5 62.5,17.5 2.25,17.75 7.25,17.75 75,17.75 33,18.75 61,19 64,19 77,19 19,19.5 23.75,19.5 26.25,19.5 14.75,19.75 21.5,19.75 99.5,19.75 33,20.25 34.5,20.25 43,20.25 45,20.25 47.5,20.25 50.5,20.25 55.5,20.25 57.5,20.25 60.5,20.25 63,20.25 65.25,20.25 69.75,20.25 71.5,20.25 75,20.25 2.25,20.5 7.25,20.5 9.75,20.75 13.25,20.75 96.75,20.75 90.25,21.5 19.25,22 2.25,22.25 7.25,22.25 17.5,22.25 99.5,22.25 9.75,22.5 13.25,22.5 96.75,22.75 51.75,23 33.5,23.25 35.75,23.25 42.5,23.25 45,23.25 24.5,23.5 25.75,23.5 30.25,23.5 17,23.75 29,23.75 48.5,23.75 52.75,23.75 62.75,23.75 65.5,23.75 68.5,23.75 9.75,24.25 13.25,24.25 24.5,24.75 25.75,24.75 28.5,24.75 49.75,24.75 52.25,24.75 96.75,24.75 99.5,24.75 64.75,25.25 67.75,25.25 70.25,25.25 30.25,25.5 34,25.5 36.25,25.5 39,25.5 41.75,25.5 45,25.5 28.5,25.75 48.5,25.75 9.75,26 17,26 96.75,26.75 2.25,27 7.25,27 54.5,27 71.5,27 99.5,27.25 16.5,28.25 30.25,28.25 48.5,28.5 85,28.5 41,28.75 42.75,28.75 44.5,28.75 96.75,28.75 19.25,29.5 21.75,29.5 13.033,29.713 4.75,29.75 33.75,29.75 35.5,29.75 37.75,29.75 88.5,29.75 99.5,29.75 10,30 41,30.75 42.75,30.75 44.5,30.75 85,30.75 96.75,30.75 69,31 57.5,31.5 59.5,31.5 30,32.25 33.75,32.25 35.5,32.25 37.75,32.25 74.75,32.25 88.5,32.25 99.5,32.25 41,32.75 42.75,32.75 44.5,32.75 49,32.75 96.75,32.75 85,33.25 15.75,33.5 25.71,33.701 2.25,34.25 5,34.25 7.5,34.25 78,34.25 71.5,34.75 88.5,34.75 96.75,34.75 99.5,34.75 30,35 33.75,35 35.5,35 37.75,35 41,35 42.75,35 44.5,35 49,35 65,35.25 10.5,35.75 12.75,35.75 15,35.75 76.25,35.75 85,35.75 2.25,36 5,36 7.5,36 69.75,36.25 23.25,36.5 26,36.5 28.25,36.5 57,36.5 96.75,36.75 63,37 74.5,37.25 88.5,37.25 99.5,37.25 59.5,37.5 68.25,37.5 2.25,37.75 5,37.75 7.5,37.75 10.5,38 12.75,38 15,38 17.5,38 20,38 23.25,38 25.75,38 30,38 85,38.25 33.5,38.5 35.5,38.5 37.75,38.5 41,38.5 42.75,38.5 44.5,38.5 48.25,38.5 78,38.5 28.25,38.75 53.5,38.75 61,38.75 96.75,38.75 71.75,39.5 99.5,39.75 52.25,40 55,40 10.5,40.25 12.5,40.25 14.75,40.25 17.5,40.25 20,40.25 23.25,40.25 25.5,40.25 85,40.75 96.75,40.75 30,41 34.5,41 36.5,41 42.75,41 44.5,41 78,41 58.25,41.75 4.75,42.25 25.5,42.25 99.5,42.25 10.5,42.5 12.5,42.5 14.75,42.5 17.5,42.5 20,42.5 23.25,42.5 34.5,42.5 36.5,42.5 42.75,42.5 44.5,42.5 75.5,42.5 96.75,42.75 69.5,43 71.75,43 88.75,43.25 78,43.5 34.5,44 36.5,44 42.75,44 44.5,44 10.5,44.75 12.5,44.75 14.75,44.75 26,44.75 96.75,44.75 99.5,44.75 2.25,45 7.25,45 54.75,45 59,45 75.5,45 88.75,45.25 34.5,45.5 36.5,45.5 42.75,45.5 44.5,45.5 66.75,45.5 69.5,45.5 71.75,45.5 61.75,45.75 85,45.75 17,46 30,46 78,46 96.75,46.75 10.5,47 12.5,47 14.75,47 34.5,47 36.5,47 42.75,47 44.5,47 56.75,47.25 88.75,47.25 99.5,47.25 75.5,47.5 59.5,47.75 17,48 28.5,48 64.75,48 69.5,48 71.75,48 85,48.25 34.5,48.5 36.5,48.5 42.75,48.5 44.5,48.5 78,48.5 30,48.75 96.75,48.75 10.5,49.25 12.5,49.25 14.75,49.25 25.25,49.25 21.13,49.4 54.25,49.5 99.5,49.75 6.5,50 9,50 17,50 62.75,50 2.25,50.25 66.75,50.25 96.75,50.75 4,51 10.5,51.5 12.5,51.5 2.25,51.75 60.75,51.75 14.75,52 79.75,52 82.25,52 25.13,52.075 17,52.25 20.25,52.25 28.5,52.25 55.5,52.25 64.75,52.25 69.25,52.25 71.75,52.25 74.25,52.25 99.5,52.25 96.75,52.75 37,53 53,53 84.75,53.25 15.75,53.5 62.75,53.75 2.25,54.25 10.5,54.5 12.5,54.5 51.25,54.5 66,54.5 69.25,54.5 71.75,54.5 74.25,54.5 76.75,54.5 82.25,54.5 31.25,54.75 40.5,54.75 43,54.75 96.75,54.75 99.5,54.75 4,55 16.1,55 18.25,55 24,55 60,55.5 2.25,55.75 6.5,56.25 8.75,56.25 13.5,56.25 24,56.5 10.75,56.75 23,57.25 99.5,57.25 15,57.75 56.25,57.75 62.75,57.75 70.25,57.75 75.25,57.75 80.25,57.75 84.75,57.75 17,58 20.5,58.25 26.25,58.5 31,58.5 22.5,58.75 10.75,59 13,59 16.5,59 27.5,59.5 48.5,59.5 51.75,59.5 36.75,59.75 40.5,59.75 43.25,59.75 99.5,59.75 26.25,60.5 28.75,60.5 2,61 7.25,61 10.75,61 13,61 55.25,61 61,61 63.5,61 68.5,61 71,61 73.5,61 76,61 88,61 90.5,61 93,61 95.5,61 98,61 21.5,61.5 10.75,63 13,63 4.75,63.5 17.25,64.75 10.75,65 13,65 64,65 67.25,65 70,65 72.5,65 75.25,65 10.75,67 13,67 20,67.75 23,67.75 26,67.75 29,67.75 32,67.75 35,67.75 38,67.75 41,67.75 44,67.75 47,67.75 50,67.75 53,67.75 56,67.75 59,67.75 62,67.75 3.5,68.75 5.75,68.75 8,68.75 10.75,68.75 13,68.75 15.75,68.75 67.25,68.75 71,68.75 78,68.75 85,68.75 92,68.75 99,68.75 18.5,70.25 21.25,70.25 24,70.25 26.75,70.25 29.5,70.25 32.25,70.25 35,70.25 37.75,70.25 40.5,70.25 43.25,70.25 46,70.25 48.75,70.25 51.5,70.25 54.25,70.25 57,70.25 59.75,70.25 62.5,70.25 65.25,70.25
GNDA: D1.19 R4.2 | length 3.3
  Signal w0.7: D1.19 ccw(c47.583,45.303) 47.583,44.464 R4.2
IREF: D1.18 R6.1 | length 3.3
  Signal w0.7: D1.18 50.029,42.17 ccw(c50.029,42.443) R6.1
nCLKREQ0: D1.4 X5.2 | length 47.1
  Highspeed layer w0.2: D1.4 35.864,39.63 ccw(c35.864,42.766) 39,42.766 39,48.75 cw(c41.25,48.75) 41.25,51 55.46,51 ccw(c55.46,53.54) 58,53.54 58,60.917 ccw(c57.8,60.917) 57.941,61.059 56.948,62.052 cw(c57.09,62.193) 56.89,62.191 X5.2
nCLKREQ1: D1.17 X5.1 | length 47.3
  Highspeed layer w0.2: D1.17 42.79,39.63 cw(c42.79,42.92) 39.5,42.92 39.5,49.317 cw(c39.7,49.316) 39.512,49.383 cw(c41.25,48.75) 41.25,50.6 54.35,50.6 55.46,50.6 ccw(c55.46,53.54) 58.4,53.54 58.4,54.651 58.4,60.9 cw(c58.6,60.9) 58.458,61.041 59.372,61.955 ccw(c59.23,62.096) 59.43,62.096 X5.1
NetC1_1: C1.1 C4.1 D3.3 VD3.2 | length 9
  Signal w0.5: D3.3 86.5,16.2 85.85,15.55 85.85,14.55 C4.1 C1.1 89.45,14.2 90,14.75 VD3.2
NetC9_1: C9.1 K5.5 R38.1 R40.2 | length 6.5
  Signal w0.5: R38.1 C9.1 28.124,13.04 ccw(c27.574,13.04) K5.5 27.571,13.59 R40.2
NetC10_1: C10.1 K5.8 R40.1 R42.2 | length 6.4
  Signal w0.5: R42.2 C10.1 28.124,19.427 cw(c27.624,19.427) 27.977,19.074 K5.8 27.574,16.89 R40.1
NetK1_3: K1.3 R20.1 | length 8.3
  Highspeed layer w0.5: K1.3 47.684,16.896 47.685,16.895 ccw(c48.037,17.25) 48.037,16.75 53.093,16.75 ccw(c53.093,17.25) 53.446,16.896 R20.1
NetK1_10: K1.10 R24.1 | length 8.2
  Highspeed layer w0.5: K1.10 47.514,14.854 cw(c47.867,14.5) 47.867,15 53.093,15 cw(c53.093,14.5) 53.446,14.854 R24.1
NetK1_12: K1.12 VD10.1 VT1.3 | length 7.8
  Signal w0.7: VT1.3@50.11,15.83 52.96,15.83 cw(c52.96,14.93) VD10.1 cw(c52.35,14.93) 52.35,13.42 K1.12
NetK2_4: K2.4 R17.2 R22.2 | length 10
  Signal w0.7: K2.4@20.78,28.09 20.78,26.17 ccw(c20.95,26.17) R22.2 26.228,26 ccw(c26.228,27.64) R17.2@27.868,27.64
NetK2_9: K2.9 R26.2 R28.2 | length 10.2
  Signal w0.7: K2.9@20.78,33.17 20.78,35.08 cw(c20.95,35.08) R28.2@20.95,35.25 ; R28.2 21.2,35.25 26.198,35.25 cw(c26.198,33.58) R26.2@27.868,33.58
NetK2_12: K2.12 VD11.1 VT2.3 | length 6.9
  Signal w0.7: K2.12@13.16,33.42 12.1,33.42 ccw(c12.1,32.03) VD11.1 ccw(c11.86,32.03) 11.86,30.88 VT2.3@13.76,30.88
NetK3_4: K3.4 R18.2 R23.2 | length 11.3
  Signal w0.7: R18.2@50.843,33.65 cw(c52.393,33.65) 52.393,35.2 R23.2 58.8,33.7 cw(c58.22,33.7) K3.4@58.22,33.12
NetK3_9: K3.9 R27.2 R29.2 | length 11.5
  Signal w0.7: R27.2 ccw(c52.688,27.795) 52.688,25.95 58.85,25.95 58.85,27.41 ccw(c58.22,27.41) K3.9@58.22,28.04
NetK3_12: K3.12 VD12.1 VT3.3 | length 8.1
  Signal w0.7: VT3.3@64.41,30.21 67.51,30.21 cw(c67.51,29.31) VD12.1 cw(c66.89,29.31) 66.89,27.79 K3.12@65.71,27.79
NetK4_12: K4.12 VD14.1 VT5.3 | length 7.7
  Signal w0.5: VT5.3@21.5,57 21.5,58.66 cw(c23.6,58.66) VD14.1 cw(c23.6,60.32) 24.04,60.32 K4.12
NetK5_12: K5.12 VD15.1 VT6.3 | length 7.4
  Signal w0.7: K5.12 16.714,18.67 ccw(c16.714,16.9) VD15.1 ccw(c15.594,16.9) 15.594,16.25 VT6.3@18.5,16.25
NetK6_4: K6.4 R19.2 | length 2.5
  Signal w0.5: R19.2 41.7,53.09 cw(c41.82,53.09) K6.4
NetK6_12: K6.12 VD13.1 VT4.3 | length 7.5
  Signal w0.5: K6.12 33.39,58.29 ccw(c33.39,56.65) VD13.1 ccw(c32.78,56.65) 32.78,55.62 VT4.3@35.27,55.62
NetR1_2: R1.2 READ.1
  other v1: 65.03,42.25
NetR2_2: R2.2 WRITE.1
  other v1: 65.08,39.5
NetR5_2: CLK_IN_P.1 R5.2 | length 7.7
  Highspeed layer w0.3: CLK_IN_P.1 4.75,57.102 ccw(c7.29,57.102) 5.494,55.306 R5.2
NetR6_2: R6.2 R7.1 | length 2.1
  Signal w0.7: R6.2@52.137,42.265 R6.2 54.105,42.25 ccw(c54.105,42.352) R7.1
NetR8_2: CLK_IN_N.1 R8.2 | length 7.7
  Highspeed layer w0.3: CLK_IN_N.1 4.75,48.898 cw(c7.29,48.898) 5.494,50.694 R8.2
NetR11_2: R11.2 RELE1.1 | length 0
  Signal w0.7: R11.2 v1(36.447,16.91)
NetR12_2: R12.2 RELE4.1
  other v1: 26.5,54.67
NetR13_2: R13.2 RELE2.1
  other v1: 20.92,23.75
NetR14_2: R14.2 RELE5.1
  other v1: 32.25,15.17
NetR15_2: R15.2 RELE3.1
  other v1: 58.92,23.7
NetR16_2: R16.2 RELE6.1
  other v1: 49,54.7
NetR30_2: R30.2 R34.1 VT1.1 | length 11.4
  Signal w0.7: R30.2 R34.1 47.96,15.03 cw(c47.96,14.88) VT1.1@48.11,14.88
NetR31_2: R31.2 R35.1 VT2.1 | length 12.1
  Signal w0.7: VT2.1@15.76,31.83 25.61,31.83 ccw(c25.61,31.93) R35.1@25.71,31.93 ; R31.2@25.71,29.58 R35.1@25.71,31.68
NetR32_2: R32.2 R36.1 VT3.1 | length 11.4
  Signal w0.7: R32.2 61.925,29.695 62.36,29.26 VT3.1@62.41,29.26 ; R32.2@53,29.9 R36.1
NetR33_2: R33.2 R37.1 VT4.1 | length 11.7
  Signal w0.5: VT4.1@37.27,56.57 46.52,56.57 ccw(c46.52,56.8) R37.1 R33.2
NetR43_2: R43.2 R45.1 VT5.1 | length 11.4
  Signal w0.5: R45.1 R43.2 cw(c22.55,45.85) 22.45,45.85 VT5.1@22.45,55
NetR44_2: R44.2 R46.1 VT6.1 | length 23.8
  Signal w0.5: VT6.1@20.5,17.2 20.5,19.96 cw(c23.04,19.96) 23.04,22.5 30.5,22.5 cw(c30.5,21.25) 31.75,21.25 31.75,17.413 cw(c31.388,17.413) 31.388,17.05 R46.1@30.009,17.05 ; R46.1 R46.1@30.009,17.05 ; R44.2 R46.1@30.009,17.05
PCI_EX0_N: D1.8 R17.1 | length 4.9
  Signal w0.2: R17.1 ccw(c27.625,29.986) 27.966,29.986 cw(c28.42,29.986) 28.42,30.44 30.78,30.44 cw(c30.78,29.47) D1.8
PCI_EX0_P: D1.7 R26.1 | length 4.9
  Signal w0.2: R26.1 27.966,31.701 ccw(c28.628,31.701) 28.628,31.04 30.78,31.04 ccw(c30.78,32.01) D1.7
PCI_EX1_N: D1.13 R27.1 | length 4.8
  Signal w0.2: D1.13 47.199,29.679 cw(c48.995,27.883) 48.995,30.423 49.5,30.423 cw(c49.5,28.939) R27.1@50.547,29.991 ; R27.1@50.519,30.019 R27.1@50.547,29.991 ; R27.1@50.547,29.991 cw(c49.5,28.939) 50.55,29.988 R27.1 R27.1@50.547,29.991
PCI_EX1_P: D1.14 R18.1 | length 4.9
  Signal w0.2: D1.14 47.233,31.767 ccw(c49.029,33.563) 49.029,31.023 49.5,31.023 ccw(c49.5,32.507) 50.55,31.458 R18.1 ; R18.1@50.508,31.415 R18.1@50.843,31.75
PCI_O_N: K2.5 K3.8 K5.4 PCI_O_N.1 | length 119.3
  Highspeed layer w0.2: PCI_O_N.1 4.75,17.7 cw(c5.75,17.7) 5.75,18.7 10.05,18.7 cw(c10.05,17.5) 11.25,17.5 ccw(c12.92,17.5) 12.92,15.83 23.88,15.83 cw(c23.88,14.676) 25.034,14.676 25.034,14.614 ; K2.5@23.32,28.09 K2.5 23.32,29.02 cw(c24.75,29.02) 23.32,29.048 ; K5.4 25.034,14.614 ; K3.8@55.68,28.04 55.68,28.6 ccw(c54,28.6) 54,30.28 53.38,30.28 ccw(c53.38,28.25) 51.35,28.25 51.35,25.04 cw(c48.21,25.04) 48.21,21.9 29.35,21.9 cw(c29.35,24.6) 26.65,24.6 26.65,28.55 ccw(c24.75,28.55) 24.75,30.45 ccw(c24.75,29.02) 23.32,29.048 ; 23.32,29.048 ccw(c21.854,29.022) 21.857,30.489 ccw(c21.854,29.022) 21.852,30.489 17.839,30.489 ccw(c17.839,28.15) 15.5,28.15 15.5,23.35 ccw(c17.75,23.35) 17.75,21.1 27.9,21.1 cw(c27.9,18.65) 30.35,18.65 30.35,18.35 cw(c27.83,18.35) 27.83,15.83 26.25,15.83 ccw(c26.25,14.614) 25.034,14.614
PCI_O_P: K2.8 K3.5 K5.9 PCI_O_P.1 | length 119.2
  Highspeed layer w0.2: PCI_O_P.1 4.75,20.3 ccw(c5.75,20.3) 5.75,19.3 10.05,19.3 cw(c10.05,17.5) 11.85,17.5 ccw(c12.92,17.5) 12.92,16.43 23.88,16.43 ccw(c23.88,17.584) 25.034,17.584 25.034,17.646 ; 23.315,32.36 cw(c22.146,32.262) 22.15,31.089 cw(c22.146,32.262) 22.146,31.089 17.839,31.089 ccw(c17.839,28.15) 14.9,28.15 14.9,23.35 ccw(c17.75,23.35) 17.75,20.5 27.9,20.5 cw(c27.9,18.65) 29.75,18.65 29.75,18.35 cw(c27.83,18.35) 27.83,16.43 26.25,16.43 cw(c26.25,17.646) 25.034,17.646 ; K2.8 23.32,32.48 ccw(c24.75,32.48) 24.75,31.05 cw(c24.75,28.55) 27.25,28.55 27.25,24.6 ccw(c29.35,24.6) 29.35,22.5 48.21,22.5 ccw(c48.21,25.04) 50.75,25.04 50.75,28.25 cw(c53.38,28.25) 53.38,30.88 54,30.88 ccw(c54,32.56) 55.68,32.56 K3.5@55.68,33.12 ; K5.9 25.034,17.646
PLL_BW: D1.1 R19.1 | length 11
  Signal w0.5: D1.1 31.75,49.46 cw(c33.04,49.46) 33.04,50.75 R19.1
READ: D2.9X3 R1.1 | length 15.7
  Signal w0.3: R1.1 67.812,41.338 ; 67.813,41.337 ccw(c68.024,41.55) 68.024,41.25 73.126,41.25 cw(c73.126,40.45) 73.693,41.014 77.619,37.088 77.621,37.087 ccw(c77.831,37.3) 77.83,37 79.026,37 ccw(c79.026,37.3) 79.238,37.088 D2.9X3
RELE1: D2.19X3 R11.1 R30.1 | length 49.2
  VDD w0.3: v1(36.447,18.78) 36.447,19.824 cw(c36.747,19.823) 36.534,20.034 37.663,21.163 cw(c37.874,20.95) 37.874,21.25 76.1,21.25 D2.19X3
  Signal w0.5: v1(36.447,18.78) R30.1
RELE2: D2.17X3 R13.1 R31.1 | length 65.3
  VDD w0.3: v1(25.71,27.68) 22.907,24.877 ccw(c23.12,24.666) 22.82,24.667 v1(22.82,23.75) 24.233,22.338 ccw(c24.445,22.55) 24.445,22.25 71.626,22.25 ccw(c71.626,22.55) 71.837,22.337 77.213,27.713 cw(c77.424,27.5) 77.424,27.8 D2.17X3
RELE3: D2.18X3 R15.1 R32.1 | length 34.9
  VDD w0.3: v1(53,27.795) 53,26.374 ccw(c53.3,26.374) 53.087,26.163 55.413,23.837 ccw(c55.624,24.05) 55.623,23.75 v1(57,23.75) 59.613,26.363 cw(c59.824,26.15) 59.824,26.45 69.076,26.45 ccw(c69.076,26.75) 69.287,26.537 71.753,29.003 cw(c71.964,28.79) 71.964,29.09 81.36,29.09 D2.18X3
RELE4: D2.16X3 R12.1 R43.1 | length 81.1
  VDD w0.3: v1(24.45,45.75) 34.45,55.75 53.876,55.75 cw(c53.876,55.45) 54.087,55.663 78.033,31.717 ccw(c78.244,31.93) 78.243,31.63 81.36,31.63 D2.16X3
  Signal w0.5: v1(24.45,45.75) ccw(c24.45,47.8) 26.5,47.8 R12.1
RELE5: D2.20X3 R14.1 R44.1 | length 66
  VDD w0.3: 29.838,14.712 30.975,13.574 31.163,13.387 ccw(c31.374,13.6) 31.372,13.3 v1(32.25,13.3) ; 29.837,14.712 cw(c30.05,14.924) 29.75,14.924 29.75,18.877 cw(c30.05,18.876) 29.837,19.087 32.413,21.663 cw(c32.624,21.45) 32.624,21.75 74,21.75 78.673,26.423 cw(c78.884,26.21) 78.884,26.51 81.4,26.51 D2.20X3
  Signal w0.5: R44.1 v1(32.25,13.3)
RELE6: D2.15X3 R16.1 R33.1 | length 42.7
  VDD w0.3: v1(49,52.8) 71.46,30.34 D2.15X3
  Signal w0.5: R33.1 v1(49,52.8)
RST_IN: R3.2 X5.OUT3 | length 2.5
  Signal w0.3: R3.2 90.03,39.33 X5.OUT3
RST_MC: D2.5X3 R3.1 | length 11.4
  Signal w0.3: D2.5X3 81.36,44.29 84.336,44.29 cw(c84.336,43.99) 84.547,44.203 87.963,40.787 cw(c87.75,40.576) 88.05,40.576 R3.1
SCL: D1.11 K1.4 | length 18.8
  Highspeed layer w0.3: v1(40,20.25) 39.5,19.75 39.5,16.676 39.676,16.5 41.54,16.5 K1.4
  Signal w0.3: v1(40,20.25) 39.966,20.284 39.966,22.343 cw(c40.266,22.342) 40.053,22.553 41.89,24.39 43.609,24.39 D1.11
SCL_F: K1.5 X5.64 | length 23.4
  VDD w0.3: K1.5 43.25,16.25 53.25,16.25 55.75,13.75 55.75,8.71 X5.64
SCL_MC: D2.15X2 R20.2 R21.1 | length 66.4
  Highspeed layer w0.3: R20.2 56.45,16 62.669,16 ccw(c62.669,16.3) 62.88,16.087 72.913,26.12 ccw(c72.7,26.331) 73,26.331 73,46.948 cw(c75.54,46.948) 73.744,48.744 81.715,56.715 81.715,60.185 80.95,60.95 R21.1 81.4,61.45 81.4,64.65 D2.15X2
SDA: D1.10 K1.9 | length 19.8
  Highspeed layer w0.3: v1(38.5,20.25) 39,19.75 39,16.341 39.341,16 41.126,16 cw(c41.126,15.7) 41.337,15.913 43.43,13.82 cw(c43.22,13.606) 43.434,13.816 cw(c43.168,13.556) 43.54,13.556 K1.9
  Signal w0.3: D1.10 35.21,24.39 36.492,24.39 cw(c36.492,24.09) 36.703,24.303 37.718,23.288 cw(c37.505,23.076) 37.728,23.277 37.772,23.229 ccw(c37.995,23.43) 37.781,23.219 38.435,22.565 cw(c38.222,22.354) 38.522,22.354 38.522,20.272 v1(38.5,20.25)
SDA_F: K1.8 X5.63 | length 22.4
  VDD w0.3: K1.8 43.25,15.67 53.123,15.67 55.25,13.543 55.25,8.47 X5.63
SDA_MC: D2.16X2 R24.2 R25.1 | length 64
  Highspeed layer w0.3: R24.2 55.45,14.8 55.9,15.25 55.95,15.25 56.2,15.5 62.876,15.5 ccw(c62.876,15.8) 63.087,15.587 73.413,25.913 ccw(c73.2,26.124) 73.5,26.124 73.5,46.948 cw(c75.54,46.948) 74.099,48.392 80.054,54.347 82.215,56.508 82.215,60.115 83.05,60.95 R25.1 83.05,62.394 ccw(c81.684,62.394) D2.16X2
WRITE: D2.11X3 R2.1 | length 15.9
  Signal w0.3: R2.1 68.112,40.662 cw(c68.324,40.45) 68.324,40.75 73.126,40.75 cw(c73.126,40.45) 73.338,40.662 77.5,36.5 79.03,36.5 D2.11X3
pads on no net: D2.1X3 D2.2X3 D2.3X3 D2.4X2 D2.4X3 D2.6X2 D2.6X3 D2.7X3 D2.8X2 D2.8X3 D2.9X2 D2.10X2 D2.10X3 D2.11X2 D2.12X2 D2.12X3 D2.13X2 D2.13X3 D2.14X2 D2.14X3 D2.17X2 D2.18X2 D2.19X2 D2.20X2 K2.3 K2.10 K3.3 K3.10 K4.3 K4.10 K5.3 K5.10 K6.8 K6.9 K6.10 X5.3 X5.4 X5.5 X5.6 X5.7 X5.8 X5.9 X5.10 X5.11 X5.12 X5.13 X5.14 X5.15 X5.16 X5.17 X5.18 X5.19 X5.20 X5.21 X5.22 X5.23 X5.24 X5.25 X5.26 X5.27 X5.28 X5.29 X5.30 X5.31 X5.32 X5.33 X5.34 X5.35 X5.36 X5.37 X5.38 X5.39 X5.40 X5.41 X5.42 X5.43 X5.44 X5.45 X5.46 X5.47 X5.48 X5.49 X5.50 X5.51 X5.52 X5.53 X5.54 X5.55 X5.56 X5.57 X5.58 X5.59 X5.60 X5.61 X5.62 X5.+12V X5.-12V X5.IN-OUT2 X5.IN-OUT3 X5.IN-OUT4 X5.IN-OUT5 X5.IN-OUT6 X5.IN-OUT7 X5.IN-OUT8 X5.NC X5.OUT4 X5.OUT5 X5.OUT6 X5.OUT7 X5.OUT8 X5.VDDF X5.VDDS X5.VEEF X5.VEES

## Polygon pours and split planes (outlines as drawn)
GND on VDD "NONET_L-01_P-001" (solid, remove dead copper, pour order 5): 0.5,71.5 0.5,0.5 103.5,0.5 103.5,71.5
GND on GND "NONET_L-01_P-001" (solid, remove dead copper, pour order 3): 0.5,71.5 0.5,0.5 103.5,0.5 103.5,71.5
GND on Highspeed layer "NONET_L-01_P-001" (solid, remove dead copper, pour order 4): 0.5,71.5 0.5,0.5 103.5,0.5 103.5,71.5
GND on Signal "NONET_L-01_P-001" (solid, remove dead copper, pour order 6): 0.5,71.5 0.5,0.5 103.5,0.5 103.5,71.5

## Other copper
Highspeed layer:
  pour cut-out: 19.807,50.374 24.04,50.374 24.04,50.68
  pour cut-out: 19.807,48.446 24.04,48.446 24.04,48.14
  pour cut-out: 5.88,54.92 5.88,51.15 9.5,51.15 9.5,54.85
  pour cut-out: 40.51,20.25 40.51,19.25 39.5,19.25
  pour cut-out: 38.5,20.76 39.983,20.76 39.983,20.267
  pour cut-out: 46.08,19.408 39,19.408 39,18.046
  pour cut-out: 52.75,17.85 52.75,13.9 56.25,13.9 56.25,17.85
  pour cut-out: 43.54,12.512 46.08,12.512 46.08,13.42
  pour cut-out: 43.54,19.408 46.08,19.408 46.08,18.5
  pour cut-out: 56.517,33.475 56.517,28.16 55.64,28.16
  pour cut-out: 32.814,39.324 46.99,39.324 46.99,39.63
  pour cut-out: 32.822,44.997 32.822,42.17 31.75,42.17
  pour cut-out: 30.678,44.997 30.678,42.17 31.75,42.17
  pour cut-out: 27.18,45.23 27.18,41.53 28.88,41.53 28.88,45.23
  pour cut-out: 82.65,26.36 86.5,26.36 86.5,25
  pour cut-out: 79.965,26.36 82.65,26.36 82.65,25.26
  pour cut-out: 79.01,25.405 79.01,22.72 80.11,22.72
  pour cut-out: 79.01,22.865 79.01,17.64 80.11,17.64
  pour cut-out: 92.298,22.936 91,22.936 91,24.25
  pour cut-out: 93.604,24.242 93.604,26.63 92.45,26.63
  pour cut-out: 93.55,42.015 93.55,44.41 92.45,44.41
  pour cut-out: 93.55,42.015 93.608,26.63 92.45,26.63
  pour cut-out: 95.135,43.31 92.45,43.31 92.45,44.41
  pour cut-out: 96.09,47.095 96.09,44.41 94.99,44.41
  pour cut-out: 92.305,48.05 94.99,48.05 94.99,46.95
  pour cut-out: 91.35,47.095 91.35,44.41 92.45,44.41
  pour cut-out: 83.75,63.36 83.75,61.25 82.85,61.25
  pour cut-out: 79.01,63.36 79.01,60.75 79.5,60.75
  pour cut-out: 78.25,61.85 78.25,60.15 85.75,60.15 85.75,61.85
  pour cut-out: 79.965,67 82.65,67 82.65,65.9
  pour cut-out: 83.75,66.045 83.75,63.36 82.65,63.36
  pour cut-out: 79.01,65.755 79.01,63.36 80.11,63.36
  pour cut-out: 56.745,64.57 60.53,64.57 60.53,62.445 56.465,62.445
VDD:
  pour cut-out: 75.25,29 75.25,25.75 76.25,25.75
  pour cut-out: 70.786,31.464 70.786,28.25 71.25,28.25
  pour cut-out: 44.448,13.42 44.448,15.67 43.25,15.67
  pour cut-out: 41,12.512 43.54,12.512 43.54,13.488
  pour cut-out: 40.092,18.5 40.092,13.42 41,13.42
  pour cut-out: 44.448,18.5 44.448,16.25 43.25,16.25
  pour cut-out: 41,19.408 43.54,19.408 43.54,18.5
  pour cut-out: 40,19.74 36.534,19.74 36.534,20.034
  pour cut-out: 37.99,20.25 37.99,21.25 38.522,21.25
  pour cut-out: 40.51,20.25 40.51,21.25 39.966,21.25
  pour cut-out: 38.5,19.74 40,19.74 40,20.25
  pour cut-out: 36.114,19.992 36.114,21.75 38,21.75
  pour cut-out: 29.397,18.898 29.397,22.25 31.25,22.25
  pour cut-out: 35.1,52.31 35.1,55.62 34.32,55.62
  pour cut-out: 33.785,52.31 31,52.31 31,52.964
  pour cut-out: 54.205,6.47 56.89,6.47 56.89,7.57
  pour cut-out: 83.75,22.865 83.75,15.1 82.65,15.1
  pour cut-out: 81.55,20.325 81.55,15.1 82.65,15.1
  pour cut-out: 81.55,20.325 81.55,22.72 82.65,22.72
  pour cut-out: 80.255,21.62 76.75,21.62 76.75,23
  pour cut-out: 80.255,21.62 82.65,21.62 82.65,22.72
  pour cut-out: 87.202,27.302 82.65,27.302 82.65,24.849
  pour cut-out: 80.255,24.16 82.65,24.16 82.65,25.26
  pour cut-out: 83.75,33.025 83.75,25.26 82.65,25.26
  pour cut-out: 79.965,33.98 82.65,33.98 82.65,32.88
  pour cut-out: 75.75,33.75 75.75,30.5 77.5,30.5
Signal:
  pour cut-out: 64.2,43.1 67.75,43.1 67.75,38.65 64.25,38.65
  pour cut-out: 52.872,34.342 52.872,35.038 52.392,35.038
  pour cut-out: 45.881,32.01 45.881,29.47 46.99,29.47
  pour cut-out: 51.1,47.111 51.1,41.061 46.99,41.061
  pour cut-out: 45.881,47.25 45.881,42.17 46.99,42.17
  pour cut-out: 20.78,34.53 20.78,31.93 26.5,31.93 26.5,35
  pour cut-out: 29.5,17.5 31.75,17.5 31.75,21.25
  pour cut-out: 28.582,20.15 30.151,20.15 30.151,11.25 28.124,11.25
  pour cut-out: 25.224,12.1 25.224,10 29.326,10
  pour cut-out: 25.224,20.15 25.224,22.5 29.75,22.5
  pour cut-out: 28.774,10 29.879,10 29.879,12.951
  pour cut-out: 32.209,17.413 32.209,12.5 29.039,12.5
  pour cut-out: 40.51,19.515 40.51,23.25 39.25,23.25
  pour cut-out: 37.99,19.586 37.99,23.25 38.5,23.25
  pour cut-out: 36.492,24.747 41.89,24.747 41.89,24.39
  pour cut-out: 41,17.592 38.61,17.592 38.61,18.78
  pour cut-out: 40.51,20.25 40.51,18.78 38.61,18.78
  pour cut-out: 37.99,20.25 37.99,18.78 38.61,18.78
  pour cut-out: 64.9,28.042 64.9,30.21 65.96,30.21
  pour cut-out: 93.89,56.965 93.89,59.5 95,59.5
  pour cut-out: 94.845,56.01 98.25,56.01 98.25,56.75
  pour cut-out: 96.09,54.715 96.09,52.03 94.99,52.03
  pour cut-out: 89.15,53.5 90.85,53.5 90.85,51.4 89.15,51.4
  pour cut-out: 86.9,51.1 90.85,51.1 90.85,49.5 86.9,49.5
  pour cut-out: 90.85,57 86.9,57 86.9,55.4 90.85,55.4
  pour cut-out: 83.75,45.725 83.75,43.04 82.65,43.04
  pour cut-out: 79.01,45.725 79.01,43.04 80.11,43.04
  pour cut-out: 79.965,41.94 82.65,41.94 82.65,43.04
  pour cut-out: 79.965,46.68 82.65,46.68 82.65,45.58
  pour cut-out: 81.21,38.105 81.21,35.42 80.11,35.42
  pour cut-out: 87.25,40.1 90.5,40.1 90.5,38.4 87.25,38.4
  pour cut-out: 90.608,16.85 90.608,18.96 90,18.96
  pour cut-out: 90.6,19.65 86.85,19.65 86.85,16.635
  pour cut-out: 84.65,14.544 84.65,16.9 86.2,16.9
  pour cut-out: 85.9,16.9 90,16.9 90,14.75
  pour cut-out: 50.26,13.538 50.26,16 51.25,16
  pour cut-out: 39.58,16.08 39.58,14.23 37.75,14.23 37.75,16.5
  pour cut-out: 35.597,19.58 35.597,16.08 39.58,16.08 39.58,19.59
  pour cut-out: 56.25,24.55 56.25,22.85 59.75,22.85 59.75,24.55
  pour cut-out: 59.874,26.091 58.878,26.091 58.878,27.084
  pour cut-out: 63.06,28.971 63.06,26.854 61.295,26.854
  pour cut-out: 59.411,26.8 60.72,26.8 60.72,28.16
  pour cut-out: 52.393,33.65 51.5,33.65 51.5,34.95
  pour cut-out: 52.86,32.83 52.86,32.277 52.514,32.277
  pour cut-out: 52.873,32.378 52.873,26.995 51.616,26.995
  pour cut-out: 49.993,34.451 51.693,34.451 51.693,26.995 49.993,26.995
  pour cut-out: 54.978,41.43 54.978,43.13 49.75,43.13 49.75,41.43
  pour cut-out: 42.5,51.6 42.5,49.9 39,49.9 39,51.6
  pour cut-out: 49.85,55.5 49.85,52 45.9,52 45.9,55.5
  pour cut-out: 45.9,57.6 45.9,52 47.6,52 47.6,57.6
  pour cut-out: 35.1,58.408 35.1,55.62 34.32,55.62
  pour cut-out: 25.65,55.5 25.65,52 27.35,52 27.35,55.5
  pour cut-out: 19.65,46.6 19.65,44.9 25.25,44.9 25.25,46.6
  pour cut-out: 11.061,27.48 13.16,27.48 13.16,28.574
  pour cut-out: 14.06,33.408 14.06,30.88 12.81,30.88
  pour cut-out: 17.34,33.408 17.34,31.75 18,31.75
  pour cut-out: 24.22,33.408 24.22,31.83 23.476,31.83
  pour cut-out: 18.122,34.19 23.32,34.19 23.32,33.29
  pour cut-out: 25.837,34.555 25.837,35 26.5,35
  pour cut-out: 25.886,33.595 25.886,32.601 28.716,32.601 28.716,34.501
  pour cut-out: 26.176,32.601 27.866,32.601 27.866,31.566
  pour cut-out: 27.016,32.601 28.716,32.601 28.716,27.045 27.016,27.045
  pour cut-out: 24.86,27.681 24.86,25.75 26.187,25.75
  pour cut-out: 24.86,32.601 26.56,32.601 26.56,27.045 24.86,27.045
  pour cut-out: 20.12,23.561 20.12,20.5 20.679,20.5
  pour cut-out: 20.12,24.6 23.5,24.6 23.5,22.9 20.12,22.9
  pour cut-out: 30.725,17.85 31.75,17.85 31.75,17.347
  pour cut-out: 30.156,21.746 30.156,22.136 30.548,22.136
  pour cut-out: 30.723,21.127 31.568,21.127 31.568,22.073
  pour cut-out: 29.15,17.85 30.859,17.85 30.859,12.5 29.039,12.5
  pour cut-out: 26.871,17.54 28.271,17.54 28.271,14.72 26.871,14.72
  pour cut-out: 25.224,12.1 28.924,12.1 28.924,10.4 25.224,10.4
  pour cut-out: 25.224,21.85 28.924,21.85 28.924,20.15 25.224,20.15
  pour cut-out: 31.4,16 33.1,16 33.1,12.5 31.4,12.5
  pour cut-out: 15.994,12.35 18.314,12.35 18.314,13.483
  pour cut-out: 18.314,18.788 18.314,16.43 17.44,16.43

## Silkscreen, mask and mechanical layers (free items; w line width, h text height)
Top Overlay:
  region: 68.25,57.076 69.527,58.26 70.527,58.26 70.822,57.965 70.822,49.455 cw(c70.227,49.455) 70.227,48.86 68.729,48.86 cw(c68.729,49.287) 68.301,49.285
  region: 68.777,58.26 cw(c69.381,57.656) 69.381,58.51 69.673,58.51 cw(c69.673,57.656) 70.277,58.26
  region: 68.777,58.26 69.527,59.01
  region: 29.5,49.75 28.5,50.75 27.5,50.75
  region: 29.5,49.75 28.5,50.75 28.5,51.75
  region: 55.64,64.68 55.64,62.14 60.72,62.14 60.72,64.68
  region: 52.98,8.82 52.98,6.28 58.06,6.28 58.06,8.82
  lines w0.2: 67.227,50.36 68.227,50.36 ; 67.266,52.25 68.25,52.25 ; 67.266,54.155 68.266,54.155 ; 67.266,56.06 68.266,56.06 ; 67.266,57.965 68.266,57.965 ; 67.477,49.36 68.25,49.36 68.25,52.25 ; 67.477,51.36 68.227,51.36 ; 67.502,53.266 68.266,53.266 ; 67.518,55.044 68.266,55.044 ; 67.518,57.076 68.266,57.076 ; 68.777,58.26 cw(c69.527,57.26) 70.277,58.26 ; 68.847,58.653 69.043,58.457 ; 70.062,58.468 70.276,58.682 ; 70.727,50.36 71.727,50.36 ; 70.806,53.266 71.502,53.266 ; 70.806,54.155 71.806,54.155 ; 70.806,56.06 71.806,56.06 ; 70.806,57.076 71.486,57.076 ; 70.806,57.965 71.806,57.965 ; 70.822,52.25 71.806,52.25 ; 70.888,51.31 71.466,51.31 ; 71.477,49.36 70.822,49.36 70.822,55.044 ; 71.486,55.044 70.822,55.044 ; 68.25,52.25 68.25,55.044 68.25,57.965 68.527,58.26 70.527,58.26 70.822,57.965 70.822,55.044 ; 1,50.53 4.25,50.53 3.75,50.03 5.75,51.03 3.75,52.03 4.25,51.53 1,51.53 1,50.53 ; 1.32,20.492 3.32,19.492 2.82,19.992 6.07,19.992 6.07,20.992 2.82,20.992 3.32,21.492 1.32,20.492
  text "PCIe BUFFER" at 64.977,59.844 h3
  text "PLL_BW" at 63.3,58.145 h0.6
  text "VDDA" at 72.427,58.086 h0.6
  text "GNDA" at 72.427,57.015 h0.6
  text "CLK_INT" at 62.8,57.002 h0.6
  text "IREF" at 72.427,55.943 h0.6
  text "CLK_INC" at 62.8,55.859 h0.6
  text "nCLKREQ0" at 57.7,55.301 h0.6 r90
  text "nCLKREQ1" at 59.591,55.297 h0.6 r90
  text "vCLKREQ1#" at 72.427,54.872 h0.6
  text "vCLKREQ0#" at 61.5,54.816 h0.6
  text "VDD" at 72.427,53.801 h0.6
  text "VDD" at 65.099,53.772 h0.6
  text "VCC - PWR_A" at 87.25,53.38 h1
  text "CLK SMA OFF/ON" at 27.75,53.26 h0.6
  text "PLL_BW +3.3/GND" at 50.25,53.21 h0.6
  text "GEN" at 1.479,52.734 h3
  text "GND" at 65.099,52.729 h0.6
  text "GND" at 72.427,52.729 h0.6
  text "PCIEXT0" at 62.8,51.686 h0.6
  text "PCIEXT1" at 72.427,51.658 h0.6
  text "VDD - PWR_D" at 87.25,50.698 h1
  text "PCIEXC0" at 62.8,50.643 h0.6
  text "PCIEXC1" at 72.427,50.586 h0.6
  text "VDD" at 65.099,49.599 h0.6
  text "VDD" at 72.427,49.515 h0.6
  text "SMBDAT" at 63.3,48.556 h0.6
  text "SMBCLK" at 72.427,48.444 h0.6
  text "PCI_EX0 NC/OUT" at 21.951,22.96 h0.6
  text "PCI_EX1 NC/OUT" at 52.25,22.71 h0.6
  text "OSC" at -0.446,16.984 h3
  text "M1-SPI-ATM64(V2)" at 89.842,14.046 h3 r90
  text "PCI_O NC/LOAD" at 21.451,10.21 h0.6
  text "SDA & SCL MC/F" at 42,10.11 h0.6
  text "SDA" at 54.147,8.76 h0.6 r45
  text "SCL" at 56.647,8.76 h0.6 r45
  text "ИЛ1397ТО1/1" at 74.363,6.908 h5
  text "9DB102BGILF" at 74.318,2.653 h6
Bottom Overlay:
  text "ИЛ1397ТО1/1" at 99.637,2.158 h5
Board:
  the board outline again, w0.2

## Dimensions
104,0 to 104,72 on Mechanical 1
0,0 to 104,0 on Mechanical 1

## Text inside footprints (layer, text, board x,y; h text height)
D1: Top Overlay "TSSOP-20 to DIP-20 15.24" at 41.006,27.731 h3 r90
K1: Bottom Overlay "-" at 49.93,13.85 h0.6 r180; Bottom Overlay "+" at 50.08,19.16 h0.6 r180
K2: Bottom Overlay "+" at 14.24,27.55 h0.6; Bottom Overlay "-" at 14.39,32.86 h0.6
K3: Bottom Overlay "-" at 64.57,28.59 h0.6 r180; Bottom Overlay "+" at 64.72,33.9 h0.6 r180
K4: Bottom Overlay "+" at 18.3,57.22 h0.6 r270; Bottom Overlay "-" at 23.61,57.07 h0.6 r270
K5: Bottom Overlay "-" at 18.644,18.24 h0.6; Bottom Overlay "+" at 18.494,12.93 h0.6
K6: Bottom Overlay "+" at 35.28,52.55 h0.6; Bottom Overlay "-" at 35.43,57.86 h0.6
VD10: Bottom Overlay "+" at 55.112,14.715 h0.6 r270
VD11: Bottom Overlay "+" at 9.458,32.245 h0.6 r90
VD12: Bottom Overlay "+" at 69.662,29.095 h0.6 r270
VD13: Bottom Overlay "+" at 30.498,56.865 h0.6 r90
VD15: Bottom Overlay "+" at 13.691,17.115 h0.6 r90